# Altium PCB Fred_ New.PcbDoc (part 1 of 2)
Units mil, origin at the board's own origin, x right, y up, seen from the top; angles counter-clockwise.
Board outline 2300 x 2166 mil, 2 copper layers (Top Layer, Bottom Layer), stack 57 mil thick; 107 components, 63 nets, 302 pads, 87 vias.
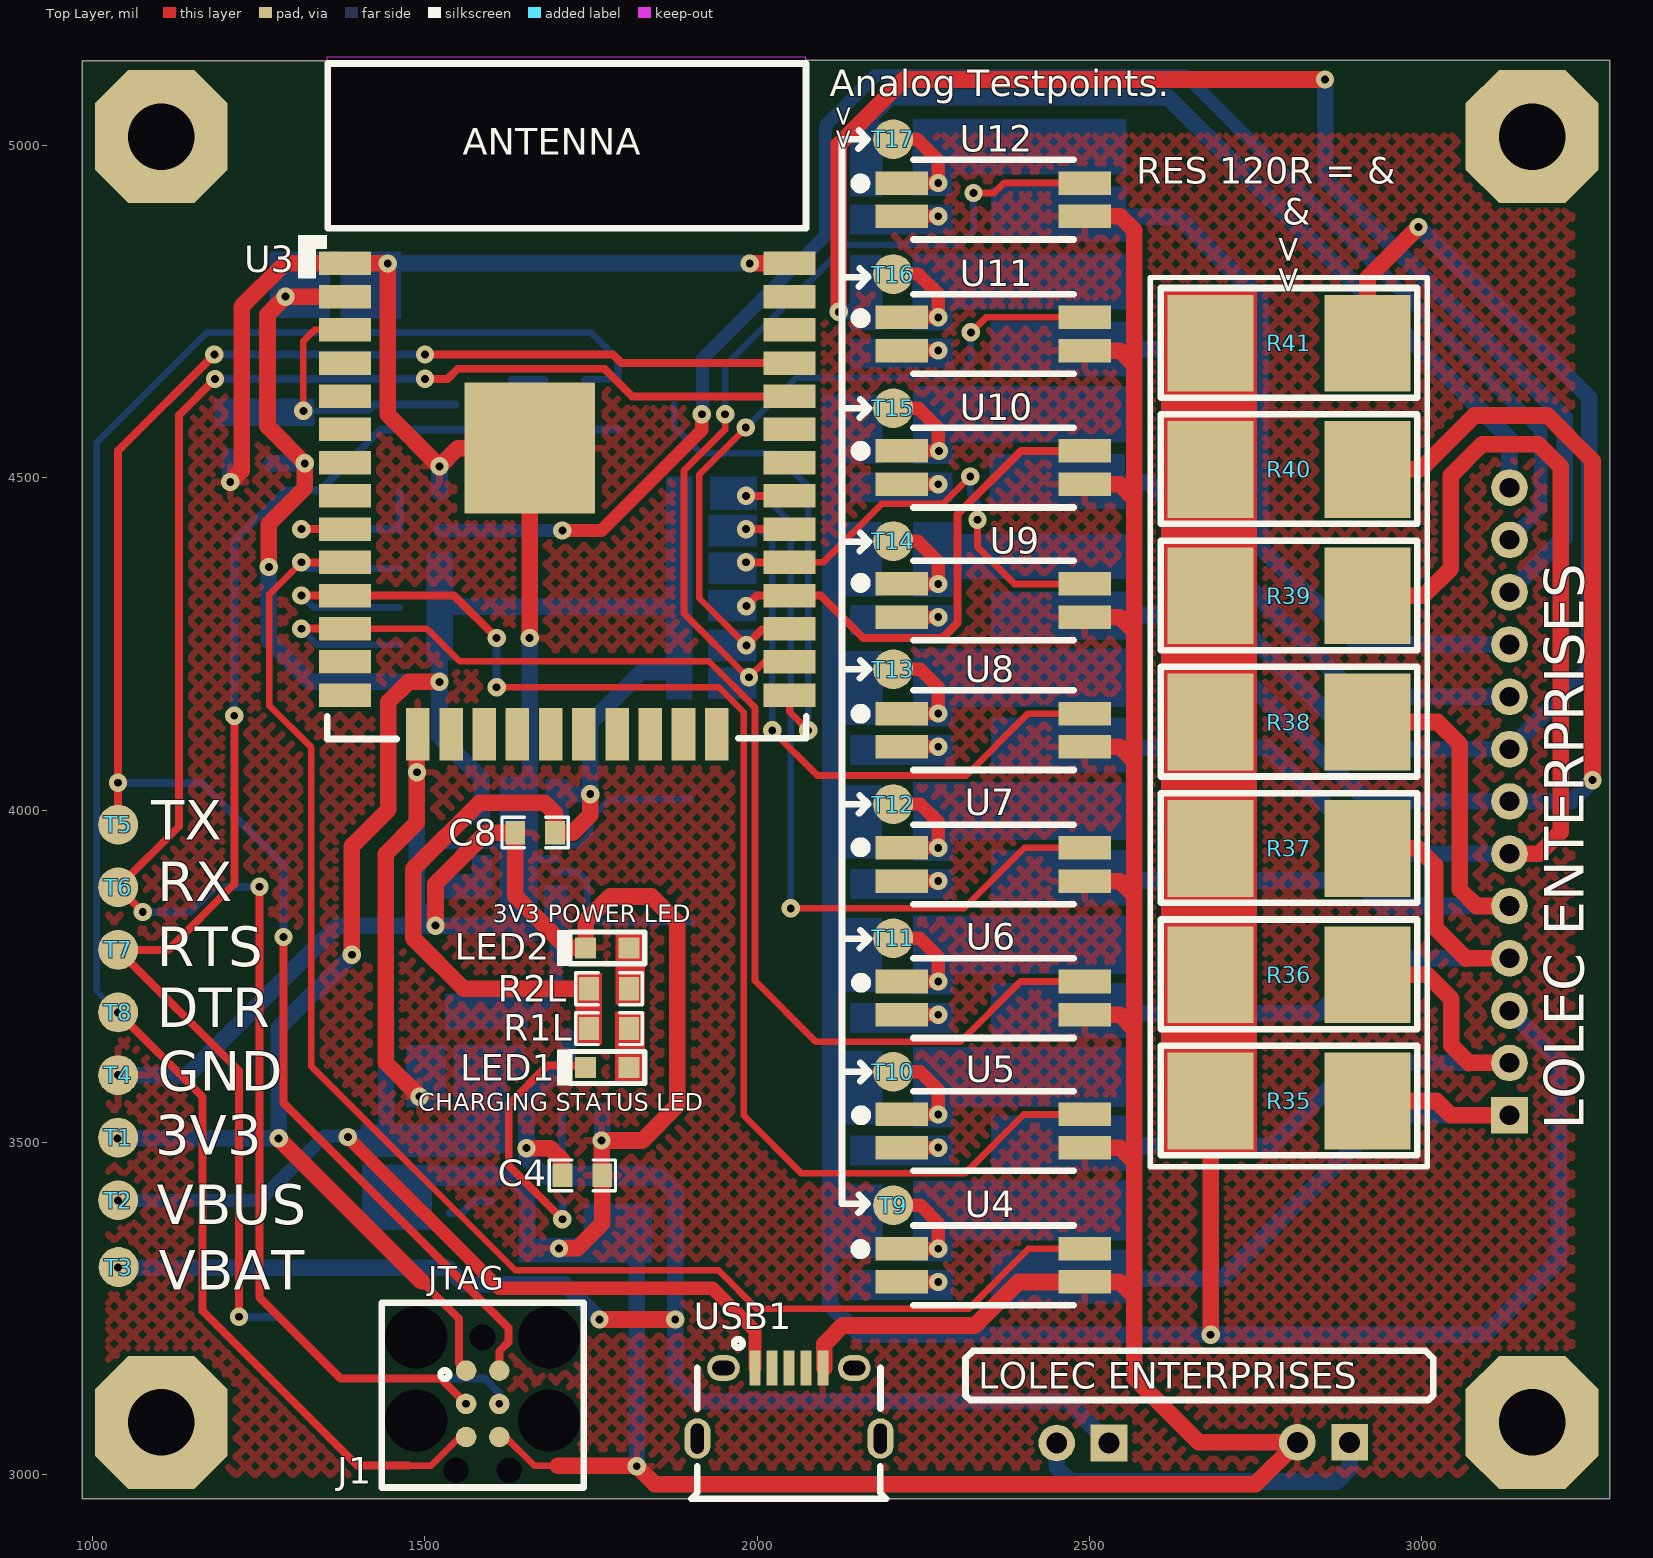
[diagram p0: Top Layer view]
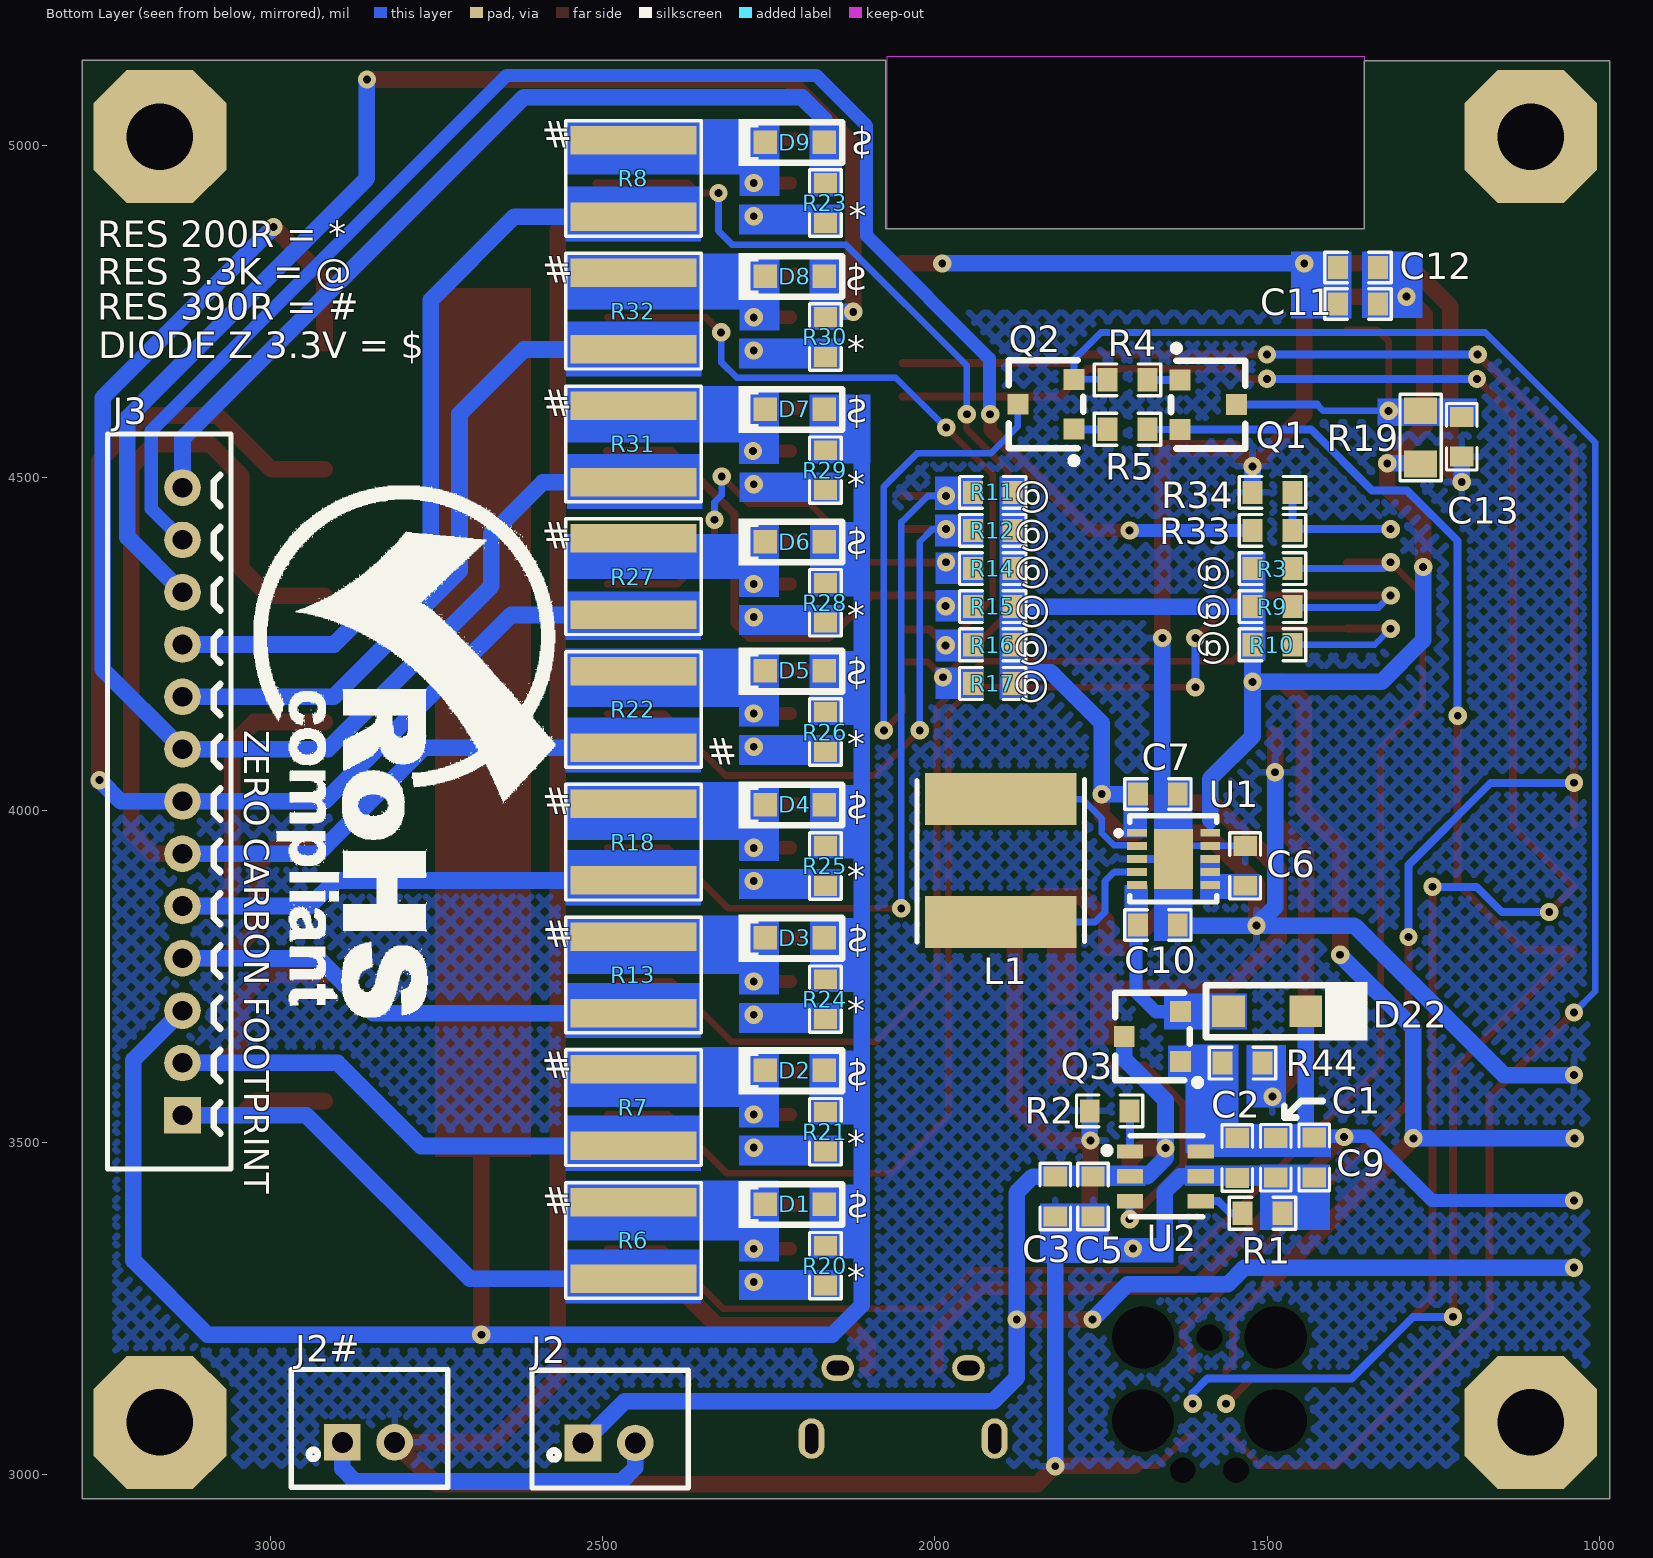
[diagram p1: Bottom Layer view, seen from below]
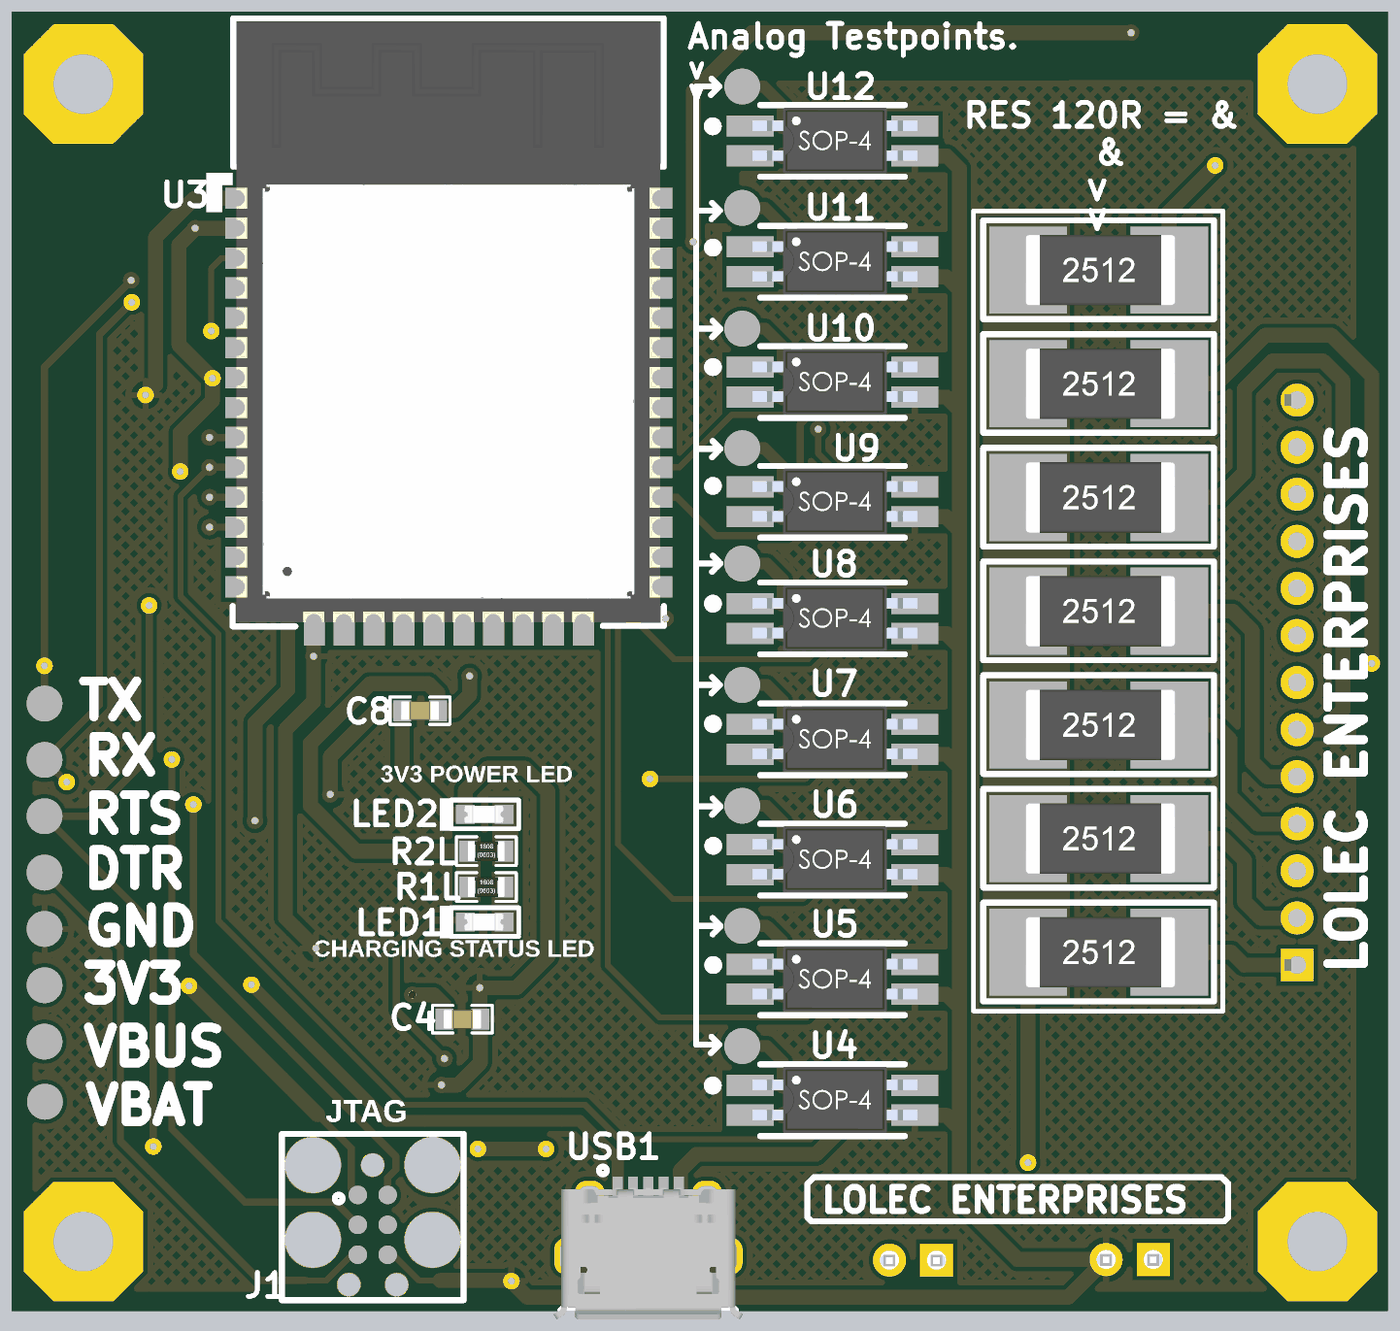
[diagram p2: 3D render of the assembled board from above, using the file's embedded part models]
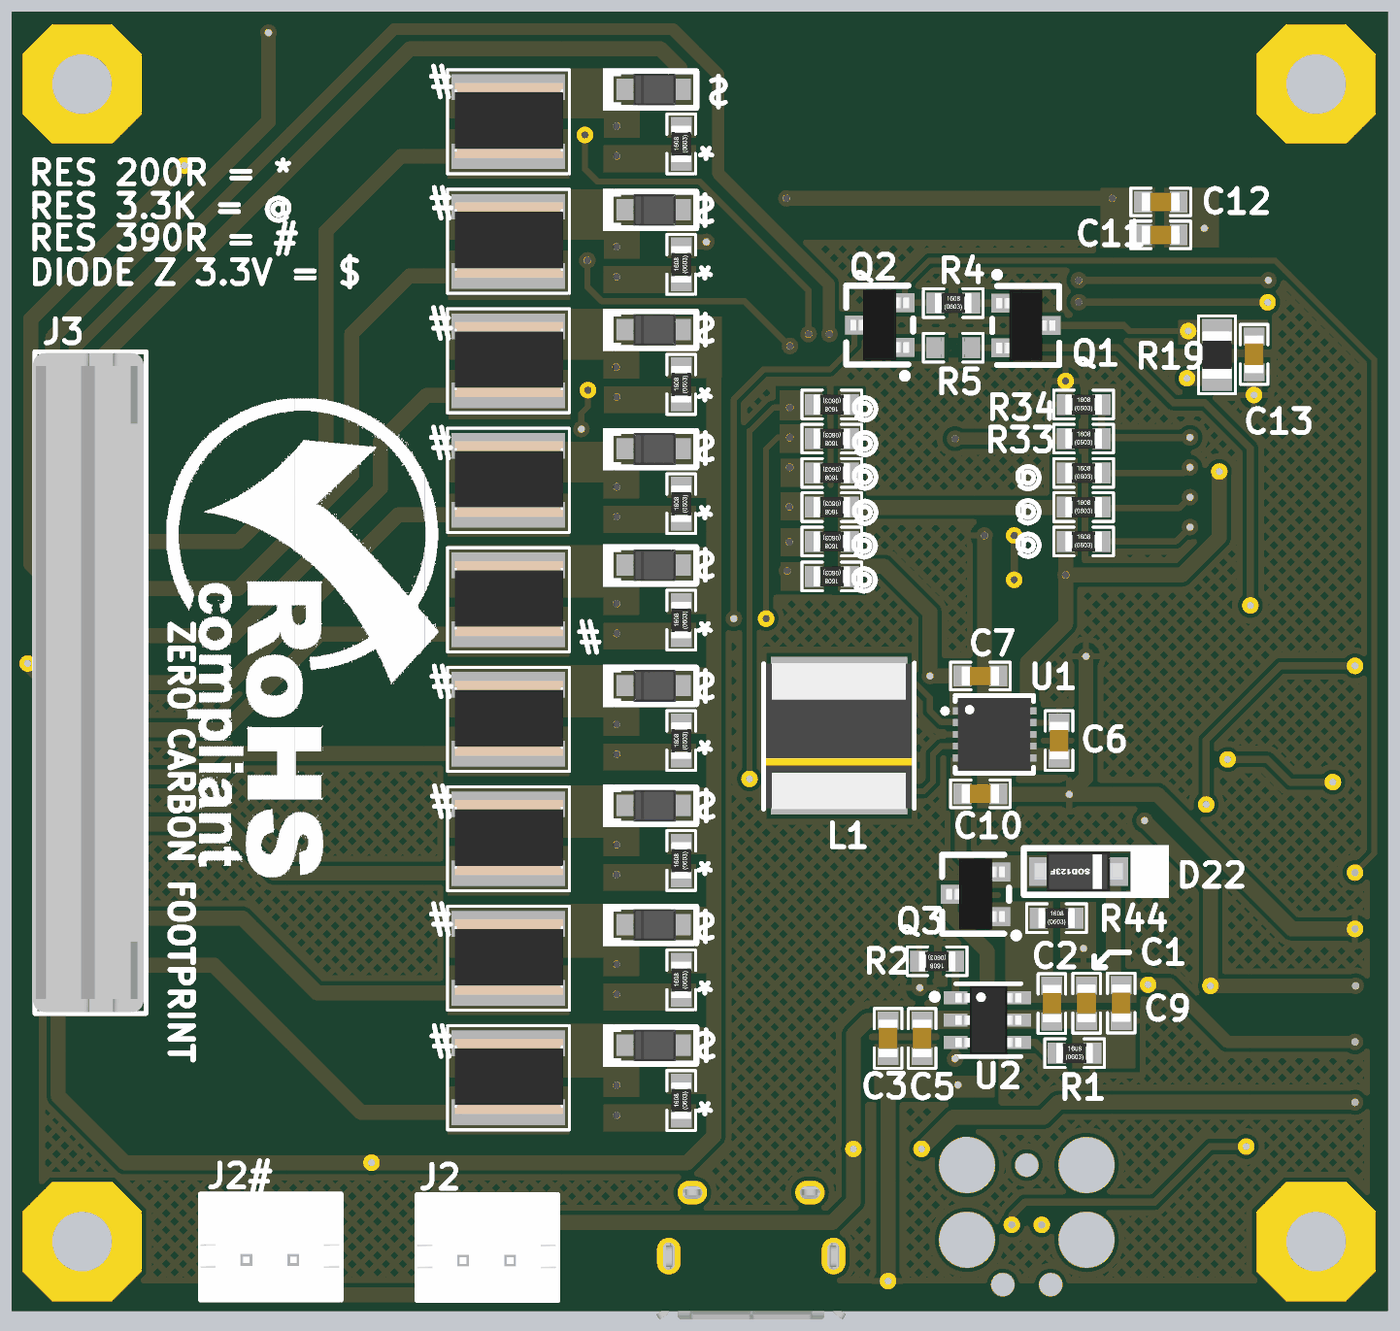
[diagram p3: 3D render of the assembled board from below, using the file's embedded part models]

## Layer stack, top to bottom
Top Solder: solder mask 3, Solder Resist, Dk 3.5
Top Layer: signal copper 10
Dielectric 1: dielectric 37, FR-4, Dk 4.8
Bottom Layer: signal copper 10
Bottom Solder: solder mask 3, Solder Resist, Dk 3.5

## Board outline
984,2963 984,5128 1353.71,5128 1353.71,4875 2074,4875 2074,5129 3284,5129 3284,2963
cut-out: 2073,4876 1353,4876 1353,5134 2073,5134

## Design rules (kind name [scope] priority, off if disabled: settings)
Clearance [All] p1: gap=7 ignorepadtopadclearanceinfootprint=FALSE
Height [All] p1: minheight=0 maxheight=5000 prefheight=500
HoleSize [All] p1: absolutevalues=TRUE maxlimit=500 minlimit=1 maxpercent=80.000 minpercent=20.000
HoleToHoleClearance [All] p1: gap=7 allowstackedmicrovias=TRUE
MinimumSolderMaskSliver [All] p1: minsoldermaskwidth=0
PolygonConnect [All] p1: connectstyle=Relief reliefconductorwidth=10 reliefentries=4 polygonreliefangle="90 Angle" airgapwidth=10
RoutingVias [All] p1: holewidth=11.81 width=27.56 viastyle="Through Hole" minholewidth=11.81 minwidth=27.56 maxholewidth=19.68 maxwidth=39.37
SilkToSilkClearance [All] p1: silktosilkclearance=1
SilkToSolderMaskClearance [IsPad] p1: minsilkscreentomaskgap=1 clearancetoexposedcopper=TRUE
SolderMaskExpansion SolderMaskExpansion_1 [Not Isvia] p1: expansion=4
SolderMaskExpansion [IsVia] p2: expansion=4 soldermaskfromhole=TRUE
UnRoutedNet [All] p1: checkbadconnections=TRUE
Width [All] p1: maxlimit=50 minlimit=10 preferedwidth=12 minimp=50.000000 maximp=50.000000 favimp=50.000000
23 further rules are at their usual default settings.

## Classes and differential pairs
component class Top_Sheet: T1 T2 T3 T4 T5 T6 T7 T8 USB1
component class U_Power_Section: C1 C2 C3 C4 C5 C6 C7 C8 C9 C10 C11 C12 D22 L1 LED1 LED2 Q3 R1 R1L R2 R2L R44 U1 U2
component class U_Opto_Section: D1 D2 D3 D4 D5 D6 D7 D8 D9 R6 R7 R8 R13 R18 R20 R21 R22 R23 R24 R25 R26 R27 R28 R29 R30 R31 R32 T9 T10 T11 T12 T13 T14 T15 T16 T17 U4 U5 U6 U7 U8 U9 U10 U11 U12
component class U_Controller_Section: C13 Q1 Q2 R3 R4 R5 R9 R10 R11 R12 R14 R15 R16 R17 R19 U3
component class U_Connector_Section: J1 J2 J2# J3 R33 R34 R35 R36 R37 R38 R39 R40 R41

## Components (designator, comment, footprint, x,y, rotation, side; value= is the part's Value field where it differs from the comment)
C1 "0.1uF" Cap0603 1487,3476.5 r90 bottom
C2 "4.7uF" Cap0603 1545,3476 r90 bottom
C3 "10uF" Cap0603 1819,3418 r90 bottom
C4 "0.1uF" Cap0603 1737,3450 r180 top
C5 "0.1uF" Cap0603 1762,3418 r90 bottom
C6 "0.1uF" Cap0603 1533,3916 r270 bottom
C7 "10uF" Cap0603 1664.52,4024 r0 bottom
C8 "0.1uF" Cap0603 1666,3966 r0 top
C9 "1uF" Cap0603 1429,3477 r90 bottom
C10 "0.1uF" Cap0603 1664.52,3827 r0 bottom
C11 "0.1uF" Cap0603 1363,4817 r180 bottom
C12 "0.1uF" Cap0603 1363,4761.88 r180 bottom
C13 "0.1uF" Cap0603 1206.83,4562 r90 bottom
D1 "MM3Z3V3B" MM3Z3V3B 2211,3406.5 r0 bottom
D2 "MM3Z3V3B" MM3Z3V3B 2211,3608 r0 bottom
D3 "MM3Z3V3B" MM3Z3V3B 2211,3807.5 r0 bottom
D4 "MM3Z3V3B" MM3Z3V3B 2211,4008 r0 bottom
D5 "MM3Z3V3B" MM3Z3V3B 2211,4209.5 r0 bottom
D6 "MM3Z3V3B" MM3Z3V3B 2211,4404 r0 bottom
D7 "MM3Z3V3B" MM3Z3V3B 2211,4603.5 r0 bottom
D8 "MM3Z3V3B" MM3Z3V3B 2211,4804 r0 bottom
D9 "MM3Z3V3B" MM3Z3V3B 2211,5005.5 r0 bottom
D22 "MBR120VLSFT3G" MBR120VLSFT3G 1442,3697 r0 bottom locked
J1 "TC2030-IDC" TC2030-IDC 1587,3106 r270 top locked
J2 "B2B-PH-K-S(LF)(SN)" B2B-PH-K-S(LF)(SN) 2490.63,3047 r180 bottom locked
J2# "B2B-PH-K-S(LF)(SN)" B2B-PH-K-S(LF)(SN) 2853,3048 r180 bottom locked
J3 "B13B-PH-K-S(LF)(SN)" B13B-PH-K-S(LF)(SN) 3133,4013 r90 bottom locked
L1 "NR6028T1R5N" NR6028T1R5N 1901,3924 r90 bottom
LED1 "APT1608QBC/D" "LED 0603" 1807,3612.46 r180 top
LED2 "APT1608QBC/D" "LED 0603" 1807,3792.46 r180 top
Q1 "MMBT2222A-7-F" SOT23-3 1588.68,4610.3 r270 bottom
Q2 "MMBT2222A-7-F" SOT23-3 1833,4611 r90 bottom
Q3 "DMP2045U-7" SOT23-3 1672.68,3659.01 r90 bottom
R1 "680R" Res0603 1507,3393 r180 bottom
R1L "330R" Res0603 1776.99,3671.02 r0 top
R2 "10K" Res0603 1737,3547 r0 bottom
R2L "330R" Res0603 1777,3731.02 r0 top
R3 "3.3K" Res0603 1492,4363.63 r180 bottom
R4 "10K" Res0603 1710,4647.7 r180 bottom
R5 "10K" Res0603 1710,4573.25 r0 bottom
R6 "390R" Res1218 2454,3352 r270 bottom
R7 "390R" Res1218 2454,3551.88 r270 bottom
R8 "390R" Res1218 2454,4951 r270 bottom
R9 "3.3K" Res0603 1492,4306.32 r180 bottom
R10 "3.3K" Res0603 1492,4249 r180 bottom
R11 "3.3K" Res0603 1913,4478.26 r0 bottom
R12 "3.3K" Res0603 1913,4420.95 r0 bottom
R13 "390R" Res1218 2454,3751.75 r270 bottom
R14 "3.3K" Res0603 1913,4363.63 r0 bottom
R15 "3.3K" Res0603 1913,4306.32 r0 bottom
R16 "3.3K" Res0603 1913,4249 r0 bottom
R17 "3.3K" Res0603 1913,4190.5 r0 bottom
R18 "390R" Res1218 2454,3951.62 r270 bottom
R19 "10K" Resistor0805 1268.83,4561 r270 bottom
R20 "200R" Res0603 2165.02,3314 r90 bottom
R21 "200R" Res0603 2165.02,3515.62 r90 bottom
R22 "390R" Res1218 2454,4151.5 r270 bottom
R23 "200R" Res0603 2165.02,4914 r90 bottom
R24 "200R" Res0603 2165.02,3715.25 r90 bottom
R25 "200R" Res0603 2165.02,3915.88 r90 bottom
R26 "200R" Res0603 2165.02,4117.5 r90 bottom
R27 "390R" Res1218 2454,4351.38 r270 bottom
R28 "200R" Res0603 2165.02,4312.12 r90 bottom
R29 "200R" Res0603 2165.02,4511.75 r90 bottom
R30 "200R" Res0603 2165.02,4712.38 r90 bottom
R31 "390R" Res1218 2454,4551.25 r270 bottom
R32 "390R" Res1218 2454,4751.12 r270 bottom
R33 "133K" Res0603 1492,4420.95 r180 bottom
R34 "49.3K" Res0603 1492,4478.26 r180 bottom
R35 "120R" Res2512 2801,3562 r0 top
R36 "120R" Res2512 2801,3752.17 r0 top
R37 "120R" Res2512 2801,3942.23 r0 top
R38 "120R" Res2512 2801,4132.5 r0 top
R39 "120R" Res2512 2801,4322.67 r0 top
R40 "120R" Res2512 2801,4512.83 r0 top
R41 "120R" Res2512 2801,4703 r0 top
R44 "100K" Res0603 1537,3619 r180 bottom
T1 "Socket" Socket 1038,3506.73 r0 top
T2 "Socket" Socket 1038,3412.48 r0 top
T3 "Socket" Socket 1038.73,3312 r0 top
T4 "Socket" Socket 1038,3600.99 r0 top
T5 "Socket" Socket 1038,3978 r0 top
T6 "Socket" Socket 1038,3883.75 r0 top
T7 "Socket" Socket 1038,3789.49 r0 top
T8 "Socket" Socket 1038,3695.24 r0 top
T9 "Socket" Socket 2205,3405 r0 top
T10 "Socket" Socket 2205,3606 r90 top
T11 "Socket" Socket 2205,3807 r0 top
T12 "Socket" Socket 2205,4009 r90 top
T13 "Socket" Socket 2205,4212 r90 top
T14 "Socket" Socket 2205,4405 r90 top
T15 "Socket" Socket 2205,4605 r90 top
T16 "Socket" Socket 2205,4807 r90 top
T17 "Socket" Socket 2205,5010 r270 top
U1 "TPS63031DSKR" TPS63031DSKR 1640.72,3926.37 r180 bottom locked
U2 "BQ21040DBVR" BQ21040DBVR 1653,3448.5 r180 bottom locked
U3 "ESP32-WROOM-32" ESP32-WROOM-32 1379.71,4823 r0 top locked
U4 "PS2801C-1-F3-A" PS2801C-1-F3-A 2218.02,3339.5 r0 top locked
U5 "PS2801C-1-F3-A" PS2801C-1-F3-A 2218.02,3541.68 r0 top locked
U6 "PS2801C-1-F3-A" PS2801C-1-F3-A 2218.02,3741.87 r0 top locked
U7 "PS2801C-1-F3-A" PS2801C-1-F3-A 2218.02,3943.06 r0 top locked
U8 "PS2801C-1-F3-A" PS2801C-1-F3-A 2218.02,4145.25 r0 top locked
U9 "PS2801C-1-F3-A" PS2801C-1-F3-A 2218.02,4340.44 r0 top locked
U10 "PS2801C-1-F3-A" PS2801C-1-F3-A 2218.02,4540.62 r0 top locked
U11 "PS2801C-1-F3-A" PS2801C-1-F3-A 2218.02,4741.81 r0 top locked
U12 "PS2801C-1-F3-A" PS2801C-1-F3-A 2218.02,4944 r0 top locked
USB1 "C10418" C10418 2048,3160 r0 top locked

## Footprints (in the part's own frame and the unit in brackets; to place one, negate y for a bottom-side part, rotate by r counter-clockwise, add the part's x,y. Pads: shape width x height; smd on the part's side, far side on the other; paste and mask are expansions set on the pad)
B2B-PH-K-S(LF)(SN) [mm]
  rect 1.4x1.4 hole 0.8: 1(-1,0)
  round 1.4 hole 0.8: 2(1,0)
  silkscreen extent -2.95,-1.72 3.03,2.78, body extent -2.95,-1.72 2.95,2.78, height 6
B13B-PH-K-S(LF)(SN) [mm]
  rect 1.4x1.4 hole 0.75: 1(-12,0)
  round 1.4 hole 0.75: 2(-10,0) 3(-8,0) 4(-6,0) 5(-4,0) 6(-2,0) 7(0,0) 8(2,0) 9(4,0) 10(6,0) 11(8,0) 12(10,0) 13(12,0)
  silkscreen extent -14.06,-1.85 14.05,2.87, body extent -14,-1.75 14,2.95, height 6
BQ21040DBVR [mm]
  rect 1x0.55 smd: 1(-1.35,0.95) 2(-1.35,0) 3(-1.35,-0.95) 4(1.35,-0.95) 5(1.35,0) 6(1.35,0.95)
  silkscreen extent -2.36,-1.55 1.42,1.55, body extent -1.35,-1.45 1.45,1.45, height 1.37
C10418 [mm] "USB - Micro B Female USB 2 5 SMD USB Connectors RoHS"
  rect 0.42x1.35 smd: 1(-1.3,0) 2(-0.65,0) 3(0,0) 4(0.65,0) 5(1.3,0)
  oval 1.25x1 hole 0.55 slot 0.85 at 0 deg: MH1(-2.5,0) MH2(2.5,0)
  oval 1x1.55 hole 0.5 slot 1.15 at 90 deg: MH3(-3.5,-2.7) MH4(3.5,-2.7)
  silkscreen extent -3.73,-5 3.72,1.1, body extent -7.67,-5.38 4.02,0.2, height 2.72
Cap0603 [mil]
  rect 30x35 smd: 1(30,0) 2(-30,0)
  silkscreen extent -50,-23 50,23, body extent -31,-16 32,16, height 34
ESP32-WROOM-32 [mm] "SMD MODULE, ESP32-D0WDQ6, 32MBIT"
  rect 2x0.9 smd: 1(0,0) 2(0,-1.27) 3(0,-2.54) 4(0,-3.81) 5(0,-5.08) 6(0,-6.35) 7(0,-7.62) 8(0,-8.89) 9(0,-10.16) 10(0,-11.43) 11(0,-12.7) 12(0,-13.97) 13(0,-15.24) 14(0,-16.51)
  rect 0.9x2 smd: 15(2.785,-18.01) 16(4.055,-18.01) 17(5.325,-18.01) 18(6.595,-18.01) 19(7.865,-18.01) 20(9.135,-18.01) 21(10.405,-18.01) 22(11.675,-18.01) 23(12.945,-18.01) 24(14.215,-18.01)
  rect 2x0.9 smd paste+0: 25(17,-16.51) 26(17,-15.24) 27(17,-13.97) 28(17,-12.7) 29(17,-11.43) 30(17,-10.16) 31(17,-8.89) 32(17,-7.62) 33(17,-6.35) 34(17,-5.08) 35(17,-3.81) 36(17,-2.54) 37(17,-1.27) 38(17,0)
  rect 5x5 smd: 39(7.061,-7.061)
  silkscreen extent -1.8,-18.19 17.64,7.65, body extent -0.52,-18.01 17.48,7.49, height 3.25
"LED 0603" [mm] "LED BLUE CLEAR CHIP SMD"
  rect 0.8x0.8 smd: 1(0,0) 2(1.65,0)
  silkscreen extent -0.61,-0.69 2.74,0.69, body extent 0.04,-0.37 1.69,0.36, height 0.65
MBR120VLSFT3G [mm] "DIODE SCHOTTKY 20V 1A SOD123FL"
  rect 1.25x1.22 smd: 1(0,0) 2(2.95,0)
  silkscreen extent -2.36,-1.12 3.81,1.12, body extent -0.4,-0.85 3.35,0.85, height 1.2
MM3Z3V3B [mm] "DIODE ZENER 3.3V 200MW SOD323F"
  rect 0.9x0.9 smd: 1(-1.125,0) 2(1.125,0)
  silkscreen extent -1.81,-0.89 2.15,0.91, body extent -1.38,-0.66 1.32,0.69, height 0.75
NR6028T1R5N [mm] "FIXED IND 1.5UH 4.2A 20.8 MOHM"
  rect 2x5.8 smd: 1(-2.35,0) 2(2.35,0)
  silkscreen extent -3.11,-3.2 3.09,3.2, body extent -3.11,-3.1 3.09,3.1, height 2.79
PS2801C-1-F3-A [mm]
  rect 2x0.9 smd: 1(0,0) 2(0,-1.27) 3(7,-1.27) 4(7,0)
  silkscreen extent -1.76,-2.16 6.58,0.89, body extent 0.11,-2.02 7.11,0.78, height 2.1
Res0603 [mil]
  rect 30x35 smd: 1(30,0) 2(-30,0)
  silkscreen extent -50,-24 50,24, body extent -31,-17 31,17, height 18
Res1218 [mm]
  rect 1.09x4.82 smd: 1(-1.465,0) 2(1.465,0)
  silkscreen extent -2.21,-2.59 2.21,2.59, body extent -1.65,-2.29 1.55,2.32, height 0.28
Res2512 [mm]
  rect 3.3x3.7 smd: 1(-3,0) 2(3,0)
  silkscreen extent -4.9,-2.08 4.9,2.11, body extent -3.1,-1.5 3.25,1.5, height 1.6
Resistor0805 [mil] "SMD 0805"
  rect 40x50 smd: 1(-40,0) 2(40,0)
  silkscreen extent -65,-31 65,31, body extent -39,-25 39,24, height 24
Socket [mil]
  round 60 smd: 1(0,0)
SOT23-3 [mm] "SOT23, 3-Leads, Body 2.9x1.3mm, Pitch 0.95mm, Lead Span 2.3mm - Reverse Pinning, IPC High Density"
  rect 0.8x0.8 smd: 1(-0.95,-1.075) 2(0.95,-1.075) 3(0,1.075)
  silkscreen extent -2.28,-1.42 1.68,1.42, body extent -1.5,-1.25 1.5,1.25, height 1.05
TC2030-IDC [mm] "CABLE ADAPTER 6 POS"
  round 0.787 smd: 1(-1.27,-0.635) 1(-1.27,-0.635) 2(-1.27,0.635) 3(0,-0.635) 4(0,0.635) 5(1.27,-0.635) 6(1.27,0.635)
  round 0 hole 2.375: MP1(-2.54,-2.54) MP2(0.635,-2.54) MP3(0.635,2.54) MP4(-2.54,2.54)
  round 0 hole 0.991: MP5(-2.54,0) MP6(2.54,-1.016) MP7(2.54,1.016)
  silkscreen extent -3.86,-3.86 3.2,3.86
TPS63031DSKR [mm] "Conv DC-DC 1.8V to 5.5V Non-Inv/Inv/Step Up/Step Down Single-Out 3.3V 0.8A 10-Pin WSON"
  rect 0.75x0.3 smd: 1(-1.4,1) 2(-1.4,0.5) 3(-1.4,0) 4(-1.4,-0.5) 5(-1.4,-1) 6(1.4,-1) 7(1.4,-0.5) 8(1.4,0) 9(1.4,0.5) 10(1.4,1)
  rect 1.5x2.3 smd: 11(0,0)
  silkscreen extent -2.21,-1.65 1.65,1.65, body extent -1.57,-1.55 1.55,1.55, height 0.7

## Part data
C1 C4 C5 C6 C8 C10 C11 C12 C13: library part CC0603ZRY5V9BB104, "CAP CER 0.1UF 50V Y5V 0603", Capacitance=100nF, Case/Package=0603, Case Code (Metric)=1608, Dielectric=Y5V, MANUFACTURER=Yageo, Max Operating Temperature=85°C, Min Operating Temperature=-30°C, Package Quantity=1, Supplier Part Number 1=311-1343-1-ND, Tolerance=80%, Voltage=50V, Case Code (Imperial)=0603, ComponentLink1Description=http://www.yageo.com/documents/recent/UPY-GPHC_Y5V_6.3V-to-50V_8.pdf?src-supplier=Digi-Key, ComponentLink1URL=http://www.yageo.com/documents/recent/UPY-GPHC_Y5V_6.3V-to-50V_8.pdf?src-supplier=Digi-Key, ComponentLink2Description=http://www.yageo.com/documents/recent/UPY-GPHC_Y5V_6.3V-to-50V_5.pdf?src-supplier=Avnet+Europe, ComponentLink2URL=http://www.yageo.com/documents/recent/UPY-GPHC_Y5V_6.3V-to-50V_5.pdf?src-supplier=Avnet+Europe, ComponentLink3Description=https://www.verical.com/server-webapp/html/getDatasheet?partID=403611&src-supplier=Verical, ComponentLink3URL=https://www.verical.com/server-webapp/html/getDatasheet?partID=403611&src-supplier=Verical, ComponentLink4Description=http://www.mouser.com/ds/2/447/Yageo_UPY-GP_NP0_16V-to-50V_9-358835.pdf?src-supplier=Mouser, ComponentLink4URL=http://www.mouser.com/ds/2/447/Yageo_UPY-GP_NP0_16V-to-50V_9-358835.pdf?src-supplier=Mouser, ComponentLink5Description=http://www.farnell.com/datasheets/1132289.pdf?src-supplier=Element14, ComponentLink5URL=http://www.farnell.com/datasheets/1132289.pdf?src-supplier=Element14, Composition=Ceramic, Depth=0.8mm, Halogen Free="Halogen Free", Height=0.8mm, Lead Free="Lead Free", Length=1.6mm, Manufacturer Part Number=CC0603ZRY5V9BB104, Mount="Surface Mount", Number of Pins=2, Packaging="Tape and Reel", Pricing 1="1=0.1, 10=0.075, 100=0.0334, 500=0.02386, 1000=0.01874 (USD)", Radiation Hardening=No, REACH SVHC="No SVHC", Stock 1=15000880, Supplier 1=Digi-Key, Termination=SMD/SMT, Thickness=0.035inch, Voltage Rating=50V, Voltage Rating (DC)=50V, Width=0.031inch
C2: library part GRM188R61E475KE11D, "CAP CER 4.7UF 25V X5R 0603", Case/Package=0603, Case Code (Metric)=1608, Dielectric=X5R, MANUFACTURER=Murata, Max Operating Temperature=85°C, Min Operating Temperature=-55°C, Package Quantity=4000, Supplier Part Number 1=490-7203-1-ND, Tolerance=10%, Voltage=25V, Capacitance=4.7uF, Case Code (Imperial)=0603, ComponentLink1Description=http://www.farnell.com/datasheets/2048165.pdf?src-supplier=Element14, ComponentLink1URL=http://www.farnell.com/datasheets/2048165.pdf?src-supplier=Element14, ComponentLink2Description=https://www.murata.com/~/media/webrenewal/support/library/catalog/products/capacitor/mlcc/c02e.ashx?la=en-us&src-supplier=Digi-Key, ComponentLink2URL=https://www.murata.com/~/media/webrenewal/support/library/catalog/products/capacitor/mlcc/c02e.ashx?la=en-us&src-supplier=Digi-Key, Depth=0.8mm, Height=0.8mm, Lead Free="Lead Free", Length=1.6mm, Manufacturer Part Number=GRM188R61E475KE11D, Material=Ceramic, Mount="Surface Mount", Packaging="Cut Tape", Pricing 1="1=0.37, 10=0.258, 100=0.1549, 500=0.1162, 1000=0.09812 (USD)", REACH SVHC="No SVHC", Stock 1=71618, Supplier 1=Digi-Key, Thickness=0.031inch, Voltage Rating=25V, Voltage Rating (DC)=25V, Width=0.031inch
C3 C7: library part C1608X5R1E106M080AC, "CAP CER 10UF 25V X5R 0603", Case/Package=0603, Case Code (Metric)=1608, Dielectric=X5R, Dielectric Material=Ceramic, MANUFACTURER=TDK, Max Operating Temperature=85°C, Min Operating Temperature=-55°C, Package Quantity=1, Supplier Part Number 1=445-9015-1-ND, Tolerance=20%, Voltage Rating=25V, Capacitance=10uF, Case Code (Imperial)=0603, Composition=Ceramic, Depth=0.8mm, Height=0.8mm, Lead Free="Lead Free", Length=1.6mm, Manufacturer Part Number=C1608X5R1E106M080AC, Mount="Surface Mount", Packaging="Tape and Reel", Pricing 1="1=0.96, 10=0.704, 100=0.483, 500=0.38238, 1000=0.322 (USD)", REACH SVHC="No SVHC", Stock 1=61681, Supplier 1=Digi-Key, Termination=SMD/SMT, Thickness=0.039inch, Voltage Rating (DC)=25V, Weight=7.1E-05oz, Width=0.8mm
C9: library part UMK107AB7105KA-T, "CAP CER 1UF 50V X7R 0603", Case/Package=0603, Case Code (Metric)=1608, Dielectric=X7R, MANUFACTURER="Taiyo Yuden", Max Operating Temperature=125°C, Min Operating Temperature=-55°C, Package Quantity=1, Supplier Part Number 1=587-3247-1-ND, Tolerance=10%, Voltage Rating=50V, Capacitance=1uF, Case Code (Imperial)=0603, ComponentLink1Description=http://www.farnell.com/datasheets/2048165.pdf?src-supplier=Element14, ComponentLink1URL=http://www.farnell.com/datasheets/2048165.pdf?src-supplier=Element14, ComponentLink2Description=https://www.murata.com/~/media/webrenewal/support/library/catalog/products/capacitor/mlcc/c02e.ashx?la=en-us&src-supplier=Digi-Key, ComponentLink2URL=https://www.murata.com/~/media/webrenewal/support/library/catalog/products/capacitor/mlcc/c02e.ashx?la=en-us&src-supplier=Digi-Key, ComponentLink3Description=https://www.yuden.co.jp/productdata/catalog/mlcc_all_e.pdf?src-supplier=Digi-Key, ComponentLink3URL=https://www.yuden.co.jp/productdata/catalog/mlcc_all_e.pdf?src-supplier=Digi-Key, ComponentLink4Description=https://www.yuden.co.jp/productdata/catalog/mlcc_all_e.pdf?src-supplier=Onlinecomponents.com, ComponentLink4URL=https://www.yuden.co.jp/productdata/catalog/mlcc_all_e.pdf?src-supplier=Onlinecomponents.com, Depth=0.8mm, Halogen Free="Halogen Free", Height=0.8mm, Length=1.6mm, Manufacturer Part Number=UMK107AB7105KA-T, Mount="Surface Mount", Packaging="Tape and Reel", Pricing 1="1=0.28, 10=0.19, 100=0.1079, 500=0.0762, 1000=0.0667 (USD)", Radiation Hardening=No, Stock 1=453098, Supplier 1=Digi-Key, Termination=SMD/SMT, Thickness=0.037inch, Voltage Rating (DC)=50V, Width=0.031inch
D1 D2 D3 D4 D5 D6 D7 D8 D9: "DIODE ZENER 3.3V 200MW SOD323F", Forward Voltage=1V, MANUFACTURER="ON Semiconductor / Fairchild", Max Operating Temperature=150°C, Max Power Dissipation=200mW, Max Reverse Leakage Current=4.5uA, Min Operating Temperature=-65°C, Package Quantity=1, Supplier Part Number 1=MM3Z3V3BCT-ND, Test Current=5mA, Tolerance=2%, Working Voltage=3.3V, ComponentLink1Description=http://www.onsemi.com/pub/Collateral/MM3Z9V1B-D.pdf?src-supplier=Digi-Key, ComponentLink1URL=http://www.onsemi.com/pub/Collateral/MM3Z9V1B-D.pdf?src-supplier=Digi-Key, ComponentLink2Description=http://www.mouser.com/ds/2/149/MM3Z3V3B-187166.pdf?src-supplier=Mouser, ComponentLink2URL=http://www.mouser.com/ds/2/149/MM3Z3V3B-187166.pdf?src-supplier=Mouser, ComponentLink3Description=https://www.fairchildsemi.com/datasheets/MM/MM3Z9V1B.pdf?src-supplier=Avnet, ComponentLink3URL=https://www.fairchildsemi.com/datasheets/MM/MM3Z9V1B.pdf?src-supplier=Avnet, ComponentLink4Description=http://www.farnell.com/datasheets/1706525.pdf?src-supplier=Element14, ComponentLink4URL=http://www.farnell.com/datasheets/1706525.pdf?src-supplier=Element14, Element Configuration=Single, Height=1mm, Impedance=89R, Lead Free="Lead Free", Length=1.3mm, Manufacturer Part Number=MM3Z3V3B, Mount="Surface Mount", Number of Pins=2, Packaging="Tape and Reel", Peak Reverse Current=4.5uA, Power Dissipation=200mW, Pricing 1="1=0.22, 10=0.18, 100=0.0956, 500=0.06288, 1000=0.04276 (USD)", Radiation Hardening=No, REACH SVHC="No SVHC", Stock 1=473644, Supplier 1=Digi-Key, Voltage Tolerance=2%, Weight=0.0276g, Width=1.7mm, Zener Voltage=3.3V
D22: "DIODE SCHOTTKY 20V 1A SOD123FL", Average Rectified Current=1A, Forward Voltage=340mV, MANUFACTURER="ON Semiconductor", Max Forward Surge Current (Ifsm)=45A, Max Operating Temperature=125°C, Max Repetitive Reverse Voltage (Vrrm)=20V, Max Reverse Leakage Current=600uA, Min Operating Temperature=-65°C, Package Quantity=10000, Supplier Part Number 1=MBR120VLSFT3GOSCT-ND, ComponentLink1Description=http://www.mouser.com/ds/2/308/MBR120VLSFT1-D-107081.pdf?src-supplier=Mouser, ComponentLink1URL=http://www.mouser.com/ds/2/308/MBR120VLSFT1-D-107081.pdf?src-supplier=Mouser, ComponentLink2Description=http://www.onsemi.com/pub/Collateral/MBR120VLSFT1-D.PDF?src-supplier=Digi-Key, ComponentLink2URL=http://www.onsemi.com/pub/Collateral/MBR120VLSFT1-D.PDF?src-supplier=Digi-Key, ComponentLink3Description=http://www.onsemi.cn/pub_link/Collateral/MBR120VLSFT1-D.PDF?src-supplier=Avnet, ComponentLink3URL=http://www.onsemi.cn/pub_link/Collateral/MBR120VLSFT1-D.PDF?src-supplier=Avnet, Current Rating=1A, Element Configuration=Single, Forward Current=1A, Halogen Free="Halogen Free", Lead Free="Lead Free", Manufacturer Part Number=MBR120VLSFT3G, Max Reverse Voltage (DC)=20V, Max Surge Current=45A, Number of Pins=2, Output Current=1A, Packaging="Tape and Reel", Peak Non-Repetitive Surge Current=45A, Peak Reverse Current=600uA, Polarity=Standard, Pricing 1="1=0.42, 10=0.338, 100=0.2298, 500=0.17234, 1000=0.12926 (USD)", Radiation Hardening=No, REACH SVHC="No SVHC", Stock 1=130499, Supplier 1=Digi-Key, Voltage Rating (DC)=20V
J1: "CABLE ADAPTER 6 POS", MANUFACTURER=Tag-Connect, Package Quantity=1, Supplier Part Number 1=TC2030-IDC-ND, ComponentLink1Description=http://www.tag-connect.com/Materials/TC2030-MCP%20Datasheet.pdf?src-supplier=Digi-Key, ComponentLink1URL=http://www.tag-connect.com/Materials/TC2030-MCP%20Datasheet.pdf?src-supplier=Digi-Key, Manufacturer Part Number=TC2030-IDC, Pricing 1="1=43.71 (USD)", Stock 1=284, Supplier 1=Digi-Key
J2 J2#: "CONN HEADER VERT 2POS 2MM", MANUFACTURER=JST, Supplier Part Number 1=455-1704-ND, Height=0.35inch, Length=0.2inch, Manufacturer Part Number=B2B-PH-K-S(LF)(SN), Pricing 1="1=0.17, 10=0.162, 100=0.1002, 500=0.08288, 1000=0.07252, 5000=0.06216, 10000=0.06044 (USD)", Stock 1=36331, Supplier 1=Digi-Key, Weight=0.0625lb, Width=0.24inch
J3: "CONN HEADER VERT 13POS 2MM", Color=Natural, Current Rating=2A, MANUFACTURER=JST, Supplier Part Number 1=455-1715-ND, Connector Type="Male Pin", Contact Material=Tin, Contact Mating Length=0.13inch, Contact Plating=Tin, Fastening Type=Detent, Gender=Male, Height=9.4mm, Housing Color=Natural, Lead Free="Lead Free", Length=27.9mm, Manufacturer Part Number=B13B-PH-K-S(LF)(SN), Mount="Through Hole", Number of Contacts=13, Number of Positions=13, Number of Rows=1, Packaging=Bulk, Pitch=0.079inch, Pricing 1="1=0.59, 10=0.549, 100=0.4206, 500=0.36574, 1000=0.30173, 5000=0.26516, 10000=0.24687 (USD)", Stock 1=5302, Supplier 1=Digi-Key, Termination=Press-Fit, Width=4.5mm
L1: "FIXED IND 1.5UH 4.2A 20.8 MOHM", Case/Package=2424, Current Rating=920mA, DC Resistance (DCR)=390mR, Inductance=47uh, Inductance Tolerance=20%, MANUFACTURER="Taiyo Yuden", Manufacturer Part Number=NR6028T470M, Max Operating Temperature=120°C, Min Operating Temperature=-25°C, Package Quantity=2000, Saturation Current=950mA, Self Resonant Frequency=8MHz, Supplier Part Number 1=587-2104-1-ND, Test Frequency=100kHz, ComponentLink1Description=https://www.yuden.co.jp/productdata/catalog/wound04_e.pdf?src-supplier=Avnet, ComponentLink1URL=https://www.yuden.co.jp/productdata/catalog/wound04_e.pdf?src-supplier=Avnet, ComponentLink2Description=https://www.yuden.co.jp/productdata/catalog/wound04_e.pdf?src-supplier=Digi-Key, ComponentLink2URL=https://www.yuden.co.jp/productdata/catalog/wound04_e.pdf?src-supplier=Digi-Key, ComponentLink3Description=https://www.yuden.co.jp/productdata/catalog/wound04_e.pdf?src-supplier=Onlinecomponents.com, ComponentLink3URL=https://www.yuden.co.jp/productdata/catalog/wound04_e.pdf?src-supplier=Onlinecomponents.com, ComponentLink4Description=https://www.yuden.co.jp/productdata/catalog/wound04_e.pdf?src-supplier=Mouser, ComponentLink4URL=https://www.yuden.co.jp/productdata/catalog/wound04_e.pdf?src-supplier=Mouser, Composition=Wirewound, Core Material=Ferrite, Halogen Free="Halogen Free", Height=2.8mm, Height - Seated (Max)=0.11inch, Length=0.236inch, Max DC Current=920mA, Mount="Surface Mount", Number of Pins=2, Packaging="Tape and Reel", Pricing 1="1=0.36, 10=0.317, 100=0.2182, 500=0.18648, 1000=0.14283 (USD)", REACH SVHC=Unknown, RMS Current (Irms)=920mA, Shielding=Shielded, Stock 1=42241, Supplier 1=Digi-Key, Termination=SMD/SMT, Tolerance=20%, Width=0.236inch
LED1 LED2: "LED BLUE CLEAR CHIP SMD", Case/Package=0603, Case Code (Metric)=1608, Color=Blue, Forward Current=20mA, Forward Voltage=3.3V, Lens Color=Clear,Colorless, MANUFACTURER=Kingbright, Max Operating Temperature=85°C, Min Operating Temperature=-40°C, Package Quantity=2000, Supplier Part Number 1=754-1434-1-ND, Case Code (Imperial)=0603, ComponentLink1Description=http://www.kingbrightusa.com/images/catalog/SPEC/APT1608QBC-D.pdf?src-supplier=Digi-Key, ComponentLink1URL=http://www.kingbrightusa.com/images/catalog/SPEC/APT1608QBC-D.pdf?src-supplier=Digi-Key, ComponentLink2Description=http://www.mouser.com/ds/2/216/APT1608QBC-D-65281.pdf?src-supplier=Mouser, ComponentLink2URL=http://www.mouser.com/ds/2/216/APT1608QBC-D-65281.pdf?src-supplier=Mouser, Dominant Wavelength=465nm, Height=0.75mm, Illumination Color=Blue, Lead Free="Lead Free", Length=1.6mm, Lens Style=Clear,Flat, Lens Transparency=Clear, Luminous Intensity=100mcd, Manufacturer Part Number=APT1608QBC/D, Mount="Surface Mount", Number of LEDs=1, Number of Pins=2, Packaging="Tape and Reel", Pricing 1="1=0.49, 10=0.35, 25=0.286, 100=0.2288, 250=0.19304, 500=0.16446, 1000=0.1287 (USD)", Stock 1=106851, Supplier 1=Digi-Key, Test Current=20mA, Viewing Angle=120°, Width=0.8mm
Q1 Q2: "TRANS NPN 40V 0.6A SMD SOT23-3", Case/Package=SOT-23, Collector Base Voltage (VCBO)=75V, Collector Emitter Breakdown Voltage=40V, Collector Emitter Saturation Voltage=1V, Continuous Collector Current=600mA, Current=1A, Emitter Base Voltage (VEBO)=6V, Frequency=300MHz, MANUFACTURER=Diodes, Max Operating Temperature=150°C, Max Power Dissipation=300mW, Min Operating Temperature=-55°C, Package Quantity=3000, Power Dissipation=350mW, Supplier Part Number 1=MMBT2222A-FDIDKR-ND, Collector Emitter Voltage (VCEO)=40V, ComponentLink1Description=http://www.diodes.com/datasheets/ds30041.pdf?src-supplier=Future+Electronics, ComponentLink1URL=http://www.diodes.com/datasheets/ds30041.pdf?src-supplier=Future+Electronics, ComponentLink2Description=http://www.diodes.com/datasheets/ds30041.pdf?src-supplier=Avnet, ComponentLink2URL=http://www.diodes.com/datasheets/ds30041.pdf?src-supplier=Avnet, ComponentLink3Description=https://www.verical.com/server-webapp/html/getDatasheet?partID=82692&src-supplier=Verical, ComponentLink3URL=https://www.verical.com/server-webapp/html/getDatasheet?partID=82692&src-supplier=Verical, ComponentLink4Description=https://www.diodes.com/assets/Datasheets/ds30041.pdf?src-supplier=Digi-Key, ComponentLink4URL=https://www.diodes.com/assets/Datasheets/ds30041.pdf?src-supplier=Digi-Key, ComponentLink5Description=http://www.diodes.com/datasheets/ds30041.pdf?src-supplier=Avnet+Europe, ComponentLink5URL=http://www.diodes.com/datasheets/ds30041.pdf?src-supplier=Avnet+Europe, ComponentLink6Description=http://www.diodes.com/datasheets/ds30041.pdf?src-supplier=Element14, ComponentLink6URL=http://www.diodes.com/datasheets/ds30041.pdf?src-supplier=Element14, Contact Plating=Matte,Tin, Current Rating=600mA, Element Configuration=Single, Gain Bandwidth Product=300MHz, Height=1mm, hFE Min=100, Lead Free="Lead Free", Length=3.05mm, Manufacturer Part Number=MMBT2222A-7-F, Max Breakdown Voltage=40V, Max Collector Current=600mA, Max Frequency=300MHz, Mount="Surface Mount", Number of Elements=1, Number of Pins=3, Packaging="Tape and Reel", Polarity=NPN, Pricing 1="1=0.15, 10=0.134, 100=0.0729, 500=0.04486, 1000=0.03059 (USD)", Radiation Hardening=No, REACH SVHC="No SVHC", Stock 1=2471182, Supplier 1=Digi-Key, Termination=SMD/SMT, Transition Frequency=300MHz, Voltage=40V, Voltage Rating (DC)=40V, Weight=0.000282oz, Width=1.4mm
Q3: "MOSFET P-CHAN 24V SOT23"
R1: library part RC0603FR-07680RL, "RES SMD 680 OHM 1% 1/10W 0603", Case/Package=0603, Case Code (Metric)=1608, MANUFACTURER=Yageo, Max Operating Temperature=155°C, Max Power Dissipation=100mW, Min Operating Temperature=-55°C, Package Quantity=1, Supplier Part Number 1=311-680HRCT-ND, Temperature Coefficient=100ppm/°C, Tolerance=1%, Voltage Rating=50V, Case Code (Imperial)=0603, ComponentLink1Description=http://www.farnell.com/datasheets/1868787.pdf?src-supplier=Element14, ComponentLink1URL=http://www.farnell.com/datasheets/1868787.pdf?src-supplier=Element14, ComponentLink2Description=http://documents.rs-components.com/techlib://itc_doclist_GB.htm?stockno=5048221&src-supplier=RSComponents, ComponentLink2URL=http://documents.rs-components.com/techlib://itc_doclist_GB.htm?stockno=5048221&src-supplier=RSComponents, ComponentLink3Description=http://www.farnell.com/datasheets/443971.pdf?src-supplier=Element14, ComponentLink3URL=http://www.farnell.com/datasheets/443971.pdf?src-supplier=Element14, ComponentLink4Description=http://www.yageo.com/documents/recent/PYu-RC_Group_51_RoHS_L_10.pdf?src-supplier=Digi-Key, ComponentLink4URL=http://www.yageo.com/documents/recent/PYu-RC_Group_51_RoHS_L_10.pdf?src-supplier=Digi-Key, Composition="Thick Film", Depth=0.8mm, Features="Moisture Resistant", Height=0.022inch, Lead Free="Lead Free", Length=1.6mm, Manufacturer Part Number=RC0603FR-07680RL, Military Standard=Not, Number of Pins=2, Number of Terminations=2, Packaging="Tape and Reel", Power Rating=100mW, Pricing 1="1=0.1, 10=0.024, 100=0.0097, 1000=0.00437, 2500=0.00379 (USD)", REACH SVHC="No SVHC", Resistance=680R, Stock 1=4278227, Supplier 1=Digi-Key, Termination=SMD/SMT, Voltage Rating (DC)=50V, Width=0.031inch
R1L R2L: library part RC0603FR-07330RL, "RES SMD 330 OHM 1% 1/10W 0603", Case/Package=0603, Case Code (Metric)=1608, MANUFACTURER=Yageo, Max Operating Temperature=155°C, Max Power Dissipation=100mW, Min Operating Temperature=-55°C, Package Quantity=1, Supplier Part Number 1=311-330HRCT-ND, Temperature Coefficient=100ppm/°C, Tolerance=1%, Voltage Rating=50V, Case Code (Imperial)=0603, ComponentLink1Description=http://www.yageo.com/documents/recent/PYu-RC_Group_51_RoHS_L_10.pdf?src-supplier=Digi-Key, ComponentLink1URL=http://www.yageo.com/documents/recent/PYu-RC_Group_51_RoHS_L_10.pdf?src-supplier=Digi-Key, ComponentLink2Description=http://www.farnell.com/datasheets/2167052.pdf?src-supplier=Mouser, ComponentLink2URL=http://www.farnell.com/datasheets/2167052.pdf?src-supplier=Mouser, ComponentLink3Description=http://www.farnell.com/datasheets/1868787.pdf?src-supplier=Element14, ComponentLink3URL=http://www.farnell.com/datasheets/1868787.pdf?src-supplier=Element14, ComponentLink4Description=http://www.farnell.com/datasheets/443971.pdf?src-supplier=Element14, ComponentLink4URL=http://www.farnell.com/datasheets/443971.pdf?src-supplier=Element14, ComponentLink5Description=http://www.farnell.com/datasheets/1686128.pdf?src-supplier=Element14, ComponentLink5URL=http://www.farnell.com/datasheets/1686128.pdf?src-supplier=Element14, ComponentLink6Description=http://documents.rs-components.com/techlib://itc_doclist_GB.htm?stockno=5046499&src-supplier=RSComponents, ComponentLink6URL=http://documents.rs-components.com/techlib://itc_doclist_GB.htm?stockno=5046499&src-supplier=RSComponents, Composition="Thick Film", Depth=0.8mm, Features="Moisture Resistant", Height=0.45mm, Lead Free="Lead Free", Length=1.6mm, Manufacturer Part Number=RC0603FR-07330RL, Number of Pins=2, Number of Terminations=2, Packaging="Tape and Reel", Power Rating=100mW, Pricing 1="1=0.1, 10=0.024, 100=0.0097, 1000=0.00437, 2500=0.00379 (USD)", REACH SVHC="No SVHC", Resistance=330R, Stock 1=9084897, Supplier 1=Digi-Key, Termination=SMD/SMT, Voltage Rating (DC)=50V, Width=0.8mm
R2 R4 R5: library part RC0603FR-0710KL, "RES SMD 10K OHM 1% 1/10W 0603", Case/Package=0603, Case Code (Metric)=1608, MANUFACTURER=Yageo, Max Operating Temperature=155°C, Min Operating Temperature=-55°C, Power Rating=100mW, Resistance=10kR, Supplier Part Number 1=311-10.0KHRDKR-ND, Temperature Coefficient=100ppm/°C, Tolerance=1%, Voltage Rating=75V, Voltage Rating (DC)=50V, Case Code (Imperial)=0603, ComponentLink1Description=http://www.farnell.com/datasheets/38590.pdf?src-supplier=Element14, ComponentLink1URL=http://www.farnell.com/datasheets/38590.pdf?src-supplier=Element14, ComponentLink2Description=https://www.verical.com/server-webapp/html/getDatasheet?partID=409289&src-supplier=Verical, ComponentLink2URL=https://www.verical.com/server-webapp/html/getDatasheet?partID=409289&src-supplier=Verical, ComponentLink3Description=http://www.farnell.com/datasheets/1868787.pdf?src-supplier=Element14, ComponentLink3URL=http://www.farnell.com/datasheets/1868787.pdf?src-supplier=Element14, ComponentLink4Description=http://www.farnell.com/datasheets/2167052.pdf?src-supplier=Element14, ComponentLink4URL=http://www.farnell.com/datasheets/2167052.pdf?src-supplier=Element14, ComponentLink5Description=http://www.farnell.com/datasheets/443971.pdf?src-supplier=Element14, ComponentLink5URL=http://www.farnell.com/datasheets/443971.pdf?src-supplier=Element14, Composition="Thick Film", Depth=0.8mm, Height=0.45mm, Lead Free="Lead Free", Lead Pitch=0.3mm, Length=1.6mm, Manufacturer Part Number=RC0603FR-0710KL, Military Standard=Not, Number of Pins=2, Packaging="Tape and Reel", Pricing 1="1=0.1, 10=0.024, 100=0.0097, 1000=0.00437, 2500=0.00379 (USD)", REACH SVHC="No SVHC", Stock 1=144725424, Supplier 1=Digi-Key, Termination=SMD/SMT, Weight=7.1E-05oz, Width=0.8mm
R3 R9 R10 R11 R12 R14 R15 R16 R17: library part RC0603FR-073K3L, "RES SMD 3.3K OHM 1% 1/10W 0603", Case/Package=0603, MANUFACTURER="Yageo Phycomp", Max Operating Temperature=155°C, Min Operating Temperature=-55°C, Power Rating=100mW, Resistance=3.3kR, Supplier Part Number 1=311-3.30KHRCT-ND, Temperature Coefficient=100ppm/°C, Tolerance=1%, Voltage Rating (DC)=50V, Depth=0.8mm, Height=0.45mm, Lead Free="Lead Free", Length=1.6mm, Manufacturer Part Number=RC0603FR-073K3L, Mount="Surface Mount", Number of Pins=2, Packaging="Cut Tape", Pricing 1="1=0.1, 10=0.024, 100=0.0097, 1000=0.00437, 2500=0.00379 (USD)", REACH SVHC="No SVHC", Stock 1=6863000, Supplier 1=Digi-Key, Width=800um
R6 R7 R8 R13 R18 R22 R27 R31 R32: library part CRW1218F390RE04Z, "RES SMD 390 OHM ±1% 1W ±100ppm/? 1218 Chip Resistor", Case/Package=1218, MANUFACTURER="Ever Ohms Tech", Supplier Part No.=C175553, ComponentLink1Description=http://www.yageo.com.tw/exep/pages/download/literatures/PYu-R_INT-thick_7.pdf?src-supplier=Digi-Key, ComponentLink1URL=http://www.yageo.com.tw/exep/pages/download/literatures/PYu-R_INT-thick_7.pdf?src-supplier=Digi-Key, ComponentLink2Description=http://www.yageo.com/documents/recent/PYu-RC_Group_51_RoHS_L_10.pdf?src-supplier=Digi-Key, ComponentLink2URL=http://www.yageo.com/documents/recent/PYu-RC_Group_51_RoHS_L_10.pdf?src-supplier=Digi-Key, ComponentLink3Description=http://www.yageo.com/documents/recent/PYu-RC_Group_51_RoHS_L_9.pdf?src-supplier=Digi-Key, ComponentLink3URL=http://www.yageo.com/documents/recent/PYu-RC_Group_51_RoHS_L_9.pdf?src-supplier=Digi-Key, ComponentLink4Description=http://www.farnell.com/datasheets/443971.pdf?src-supplier=Element14, ComponentLink4URL=http://www.farnell.com/datasheets/443971.pdf?src-supplier=Element14, Link=https://lcsc.com/product-detail/Chip-Resistor-Surface-Mount_Ever-Ohms-Tech-CR1218F390RE04_C175553.html, Manufacturer Part No.=CRW1218F390RE04Z, Resistance=390R, Supplier=LCSC, Termination=SMD/SMT
R19: library part RT0805BRB0710KL, "RES SMD 10K OHM 0.1% 1/8W 0805", Case/Package=0805, Case Code (Metric)=2012, MANUFACTURER=Yageo, Max Operating Temperature=125°C, Max Power Dissipation=125mW, Min Operating Temperature=-55°C, Package Quantity=1, Resistance=10kR, Supplier Part Number 1=311-10KNFCT-ND, Temperature Coefficient=10ppm/°C, Tolerance=0.1%, Voltage Rating=150V, Case Code (Imperial)=0805, ComponentLink1Description=http://www.yageo.com/documents/recent/PYu-RT_1-to-0.05_RoHS_L_6.pdf?src-supplier=Avnet, ComponentLink1URL=http://www.yageo.com/documents/recent/PYu-RT_1-to-0.05_RoHS_L_6.pdf?src-supplier=Avnet, Composition="Thin Film", Contact Plating=Tin,Matte, Depth=1.25mm, Features="Moisture Resistant", Height=0.024inch, Length=2mm, Manufacturer Part Number=RT0805BRB0710KL, Military Standard=Not, Number of Terminations=2, Packaging="Tape and Reel", Power Rating=125mW, Pricing 1="1=0.73, 10=0.606, 100=0.4071, 1000=0.23925 (USD)", Radiation Hardening=No, Stock 1=13114, Supplier 1=Digi-Key, Termination=SMD/SMT, Weight=0.000194oz, Width=1.25mm
R20 R21 R23 R24 R25 R26 R28 R29 R30: library part RT0603DRD07200RL, "RES SMD 200 OHM 0.5% 1/10W 0603", Case/Package=0603, MANUFACTURER=Yageo, Power Rating=100mW, Supplier Part Number 1=311-200DCT-ND, Tolerance=0.5%, Voltage Rating (DC)=50V, Lead Free="Lead Free", Manufacturer Part Number=RT0603DRD07200RL, Packaging="Cut Tape", Pricing 1="1=0.21, 10=0.174, 100=0.0682, 1000=0.02855, 2500=0.02617 (USD)", Resistance=200R, Stock 1=19572, Supplier 1=Digi-Key
R33: library part RC0603FR-07133KL, "RES SMD 133K OHM 1% 1/10W 0603", Case/Package=0603, Case Code (Metric)=1608, MANUFACTURER=Yageo, Max Operating Temperature=155°C, Max Power Dissipation=100mW, Min Operating Temperature=-55°C, Package Quantity=1, Resistance=133kR, Supplier Part Number 1=311-133KHRCT-ND, Temperature Coefficient=100ppm/°C, Tolerance=1%, Voltage Rating=50V, Case Code (Imperial)=0603, ComponentLink1Description=http://www.yageo.com/documents/recent/PYu-RC_Group_51_RoHS_L_10.pdf?src-supplier=Digi-Key, ComponentLink1URL=http://www.yageo.com/documents/recent/PYu-RC_Group_51_RoHS_L_10.pdf?src-supplier=Digi-Key, ComponentLink2Description=http://www.yageo.com/documents/recent/PYu-RC_Group_51_RoHS_L_9.pdf?src-supplier=Digi-Key, ComponentLink2URL=http://www.yageo.com/documents/recent/PYu-RC_Group_51_RoHS_L_9.pdf?src-supplier=Digi-Key, ComponentLink3Description=http://www.mouser.com/catalog/specsheets/RC0603.pdf?src-supplier=Mouser, ComponentLink3URL=http://www.mouser.com/catalog/specsheets/RC0603.pdf?src-supplier=Mouser, Composition="Thick Film", Depth=0.8mm, Features="Moisture Resistant", Height=0.022inch, Lead Free="Lead Free", Length=1.6mm, Manufacturer Part Number=RC0603FR-07133KL, Military Standard=Not, Number of Terminations=2, Packaging="Tape and Reel", Power Rating=100mW, Pricing 1="1=0.1, 10=0.024, 100=0.0097, 1000=0.00437, 2500=0.00379 (USD)", Stock 1=1119965, Supplier 1=Digi-Key, Termination=SMD/SMT, Voltage Rating (DC)=50V, Width=0.031inch
R34: library part RT0603DRE0749K3L, "Thin Film Resistors - SMD 1/10W 49.3K Ohms .5%", Case/Package=0603, MANUFACTURER=Yageo, Resistance=49.3kR, Supplier Part Number 1=603-RT0603DRE0749K3L, Tolerance=0.5%, Manufacturer Part Number=RT0603DRE0749K3L, Pricing 1="1=0.16, 10=0.09, 50=0.09, 100=0.03, 1000=0.03, 10000=0.02 (USD)", Stock 1=12765, Supplier 1=Mouser
R35 R36 R37 R38 R39 R40 R41: library part 3522120RJT, "RES SMD 120 OHM 5% 3W 2512", Case/Package=2512, Case Code (Metric)=6432, MANUFACTURER="TE Connectivity CGS", Max Operating Temperature=105°C, Min Operating Temperature=-55°C, Number of Resistors=1, Power Rating=3W, Supplier Part Number 1=A121132CT-ND, Temperature Coefficient=100ppm/°C, Tolerance=5%, Voltage Rating=250V, Case Code (Imperial)=2512, Composition="Power resistor,Thick Film", Depth=3.2mm, Height=1.1mm, Length=6.35mm, Manufacturer Part Number=3522120RJT, Mount="Surface Mount", Number of Terminations=2, Packaging="Tape and Reel", Pricing 1="1=0.65, 10=0.541, 100=0.3634, 1000=0.21265 (USD)", REACH SVHC=Unknown, Resistance=120R, Stock 1=33369, Supplier 1=Digi-Key, Termination=Solder, Voltage Rating (DC)=250V
R44: library part RT0603BRD07100KL, "RES SMD 100K OHM 0.1% 1/10W 0603", Case/Package=0603, Case Code (Metric)=1608, MANUFACTURER=Yageo, Max Operating Temperature=125°C, Max Power Dissipation=100mW, Min Operating Temperature=-55°C, Package Quantity=5000, Resistance=100kR, Supplier Part Number 1=YAG1235CT-ND, Temperature Coefficient=25ppm/°C, Tolerance=0.1%, Voltage Rating=75V, Case Code (Imperial)=0603, ComponentLink1Description=http://documents.rs-components.com/techlib://itc_doclist_GB.htm?stockno=6174810&src-supplier=RSComponents, ComponentLink1URL=http://documents.rs-components.com/techlib://itc_doclist_GB.htm?stockno=6174810&src-supplier=RSComponents, Composition="Thin Film", Depth=0.8mm, Features="Moisture Resistant", Height=0.022inch, Lead Free="Lead Free", Length=1.6mm, Manufacturer Part Number=RT0603BRD07100KL, Military Standard=Not, Mount="Surface Mount", Number of Terminations=2, Packaging="Tape and Reel", Power Rating=100mW, Pricing 1="1=0.39, 10=0.332, 100=0.1298, 1000=0.05435, 2500=0.04982 (USD)", Stock 1=53395, Supplier 1=Digi-Key, Termination=SMD/SMT, Voltage Rating (DC)=75V, Width=0.031inch, Working Voltage=75V
U1: "Conv DC-DC 1.8V to 5.5V Non-Inv/Inv/Step Up/Step Down Single-Out 3.3V 0.8A 10-Pin WSON", MANUFACTURER="Texas Instruments", Max Input Voltage=5.5V, Max Operating Temperature=85°C, Max Output Current=800mA, Min Input Voltage=1.8V, Min Operating Temperature=-40°C, Min Output Voltage=3.3V, Package Quantity=3000, Quiescent Current=25uA, Supplier Part Number 1=TPS63031DSKR**MULT1, Switching Frequency=2.4MHz, ComponentLink1Description=http://www.ti.com/lit/ds/symlink/tps63001.pdf, ComponentLink1URL=http://www.ti.com/lit/ds/symlink/tps63001.pdf, ComponentLink2Description=http://focus.ti.com/lit/ds/symlink/tps63001.pdf, ComponentLink2URL=http://focus.ti.com/lit/ds/symlink/tps63001.pdf, ComponentLink3Description=http://www.ti.com/general/docs/lit/getliterature.tsp?genericPartNumber=TPS63002&&fileType=pdf, ComponentLink3URL=http://www.ti.com/general/docs/lit/getliterature.tsp?genericPartNumber=TPS63002&&fileType=pdf, ComponentLink4Description=http://www.ti.com/general/docs/lit/getliterature.tsp?genericPartNumber=TPS63031&&fileType=pdf&src-supplier=Avnet, ComponentLink4URL=http://www.ti.com/general/docs/lit/getliterature.tsp?genericPartNumber=TPS63031&&fileType=pdf&src-supplier=Avnet, ComponentLink5Description=http://www.ti.com/lit/ds/symlink/tps63030.pdf?src-supplier=Digi-Key, ComponentLink5URL=http://www.ti.com/lit/ds/symlink/tps63030.pdf?src-supplier=Digi-Key, Contact Plating=Gold, Efficiency=96%, Lead Free="Lead Free", Manufacturer Part Number=TPS63031DSKR, Mount="Surface Mount", Nominal Output Voltage=3.3V, Number of Outputs=1, Number of Pins=10, Operating Supply Voltage=5.5V, Output Configuration=Positive, Output Current=800mA, Output Type=Fixed, Output Voltage=3.3V, Packaging="Tape and Reel", Radiation Hardening=No, REACH SVHC="No SVHC", Stock 1=0, Supplier 1=Arrow, Synchronous Rectifier=Yes, Topology=Buck-Boost
U2: "IC BAT CHG LI-ION 1 CELL SOT23-6", MANUFACTURER="Texas Instruments", Supplier Part Number 1=296-47315-1-ND, Lead Free="Lead Free", Manufacturer Part Number=BQ21040DBVR, Number of Cells=1, Pricing 1="1=1.14, 10=1.015, 100=0.7912, 500=0.65364, 1000=0.51603 (USD)", Stock 1=10857, Supplier 1=Digi-Key
U3: "SMD MODULE, ESP32-D0WDQ6, 32MBIT", MANUFACTURER="Espressif Systems", Supplier Part Number 1=1904-1010-1-ND, Manufacturer Part Number=ESP32-WROOM-32, Pricing 1="1=3.8 (USD)", Stock 1=968, Supplier 1=Digi-Key
U4 U5 U6 U7 U8 U9 U10 U11 U12: "TransistorOptocouplers DC 1 2500Vrms SOP-4_P1.27 Optocouplers RoHS", Case/Package=SOIC, Collector Emitter Saturation Voltage=300mV, Forward Voltage=1.2V, MANUFACTURER=CEL, Max Collector Current=30mA, Max Operating Temperature=100°C, Max Output Voltage=80V, Max Power Dissipation=120mW, Min Operating Temperature=-55°C, Package Quantity=1, Supplier Part Number 1=PS2801C-1-F3-ACT-ND, Collector Emitter Voltage (VCEO)=300mV, ComponentLink1Description=http://www.cel.com/pdf/datasheets/PS2801C-1,PS2801C-4.pdf?src-supplier=Digi-Key, ComponentLink1URL=http://www.cel.com/pdf/datasheets/PS2801C-1,PS2801C-4.pdf?src-supplier=Digi-Key, ComponentLink2Description=http://www.cel.com/pdf/datasheets/how_to_order_optos.pdf?src-supplier=Digi-Key, ComponentLink2URL=http://www.cel.com/pdf/datasheets/how_to_order_optos.pdf?src-supplier=Digi-Key, ComponentLink3Description=http://datasheet.iiic.cc/cel/PS2801C-1-F3-A.pdf?src-supplier=IIIC, ComponentLink3URL=http://datasheet.iiic.cc/cel/PS2801C-1-F3-A.pdf?src-supplier=IIIC, Lead Free="Lead Free", Manufacturer Part Number=PS2801C-1-F3-A, Mount="Surface Mount", Number of Channels=1, Number of Pins=4, Output Current per Channel=30mA, Packaging="Tape and Reel", Pricing 1="1=0.77, 10=0.595, 100=0.3825 (USD)", Stock 1=399, Supplier 1=Digi-Key
USB1: "USB - Micro B Female USB 2 5 SMD USB Connectors RoHS", MANUFACTURER="Jing Extension of the Electronic Co.", ComponentLink1Description=http://www.amphenol-icc.com/media/wysiwyg/files/drawing/10118194.pdf?src-supplier=Digi-Key, ComponentLink1URL=http://www.amphenol-icc.com/media/wysiwyg/files/drawing/10118194.pdf?src-supplier=Digi-Key, ComponentLink2Description=https://cdn.amphenol-icc.com/media/wysiwyg/files/drawing/10118194.pdf?src-supplier=Mouser, ComponentLink2URL=https://cdn.amphenol-icc.com/media/wysiwyg/files/drawing/10118194.pdf?src-supplier=Mouser, ComponentLink3Description=https://cdn.amphenol-icc.com/media/wysiwyg/files/drawing/10118194.pdf?src-supplier=Verical, ComponentLink3URL=https://cdn.amphenol-icc.com/media/wysiwyg/files/drawing/10118194.pdf?src-supplier=Verical, Connector Type=USB,Receptacle, Gender=Receptacle, Link=https://lcsc.com/product-detail/USB-Connectors_Jing-Extension-of-the-Electronic-Co-C10418_C10418.html, Manufacturer Part Number=C10418, Mount="Surface Mount,Horizontal", Number of Contacts=5, Number of Ports=1, Number of Terminals=5, Orientation="Right Angle", Termination=Solder
T1 T2 T3 T4 T5 T6 T7 T8 T9 T10 T11 T12 T13 T14 T15 T16 T17: LatestRevisionDate=17-Jul-2002, LatestRevisionNote="Re-released for DXP Platform.", Publisher="Altium Limited"

## Free pads (board coordinates)
  oct 200x200 hole 100: MH(1103,3078) MH(1103,5014) MH(3167,3078) MH(3167,5014)

## Via types
v1: diameter 27.56, hole 11.81, Top Layer to Bottom Layer, tented both sides, 57 vias
v2: diameter 27.56, hole 11.81, Top Layer to Bottom Layer, 30 vias

## Nets (pads, with @x,y where several pads share a name; then routed paths per layer and width w, separated by ;. In a path a pad name is that pad's centre, name@x,y a point inside that pad or via, vN(x,y) a via of type N, cw(c..) or ccw(c..) an arc to the next point about the centre after c; other vN are vias at no path point)
2_GND: D8.1 J3.11 R30.1 | length 2046.9
  Top Layer w25: v1(2123,4750.08) 2123,5002 2221,5100 v1(2855.34,5100)
  Bottom Layer w25: v1(2123,4750.08) 2157.31,4750.08 R30.1 ; D8.1@2152,4804 D8.1 ; v1(2855.34,5100) 2855.34,4951.12 3216,4590.46 3216,4410.96 J3.11 ; J3.11@3124,4327.96 J3.11@3128.5,4332.46
3_GND: D9.1 J3.13 R23.1 | length 1309.8
  Bottom Layer w25: D9.1@2160.5,5011.71 D9.1 2166.71,5039.71 2200,5073 2619.4,5073 3133,4559.4 J3.13
3V3: C7.1 C8.1 C11.1 C12.1 J1.1 R1L.2 R2L.2 R3.2 R9.2 R10.2 R11.2 R12.2 R14.2 R15.2 R16.2 R17.2 R19.2 T1.1 U1.1 U1.10 U3.2 | length 4305.8
  Top Layer w12: 1495,3290.47 1551,3234.47 1551,3167 J1.1@1562,3156
  Top Layer w25: v2(1265,4366) 1265,4431 1319,4485 v2(1319,4522) 1263,4578 1263,4745.97 v1(1290.03,4773) U3.2 ; v2(1279.73,3505.73) 1495,3290.47 ; v1(1390,3782.02) 1390,3946 1445,4001 1445,4163 1475,4193 v1(1522,4193) ; R2L.2 1558.52,3731.02 1482.72,3806.82 1482.72,3911.72 1582,4011 1680,4011 1696,3995 C8.1 1722.73,3966 1749,3992.27 v1(1749,4024)
  Bottom Layer w10: U1.10 1585.6,3985
  Bottom Layer w25: v1(1037,3505.73) v2(1279.73,3505.73) 1279.73,3671.76 v1(1390,3782.02) ; v2(1265,4366) 1265,4255.71 1327.71,4193 v1(1522,4193) ; R19.2 1269.83,4522 v2(1319,4522) ; R10.2 v1(1522,4193) ; R9.2@1522,4306 R15.2@1883,4306 ; 1585.6,3985 1585.6,4047.4 1522,4111 v1(1522,4193) ; C7.1 v1(1749,4024) 1749,4131 1825.5,4207.5 R17.2@1883,4207.5
AN_1: D1.2 R6.1 T9.1 U4.1 | length 172.8
  Top Layer w20: T9.1 2246.21,3405 2273,3378.21 v1(2273,3339.5) U4.1
AN_2: D2.2 R7.1 T10.1 U5.1 | length 166.3
  Top Layer w20: T10.1 2245.71,3606 2273,3578.71 v1(2273,3541.68) ; U5.1 v1@2268,3541.68
AN_4: D3.2 R13.1 T11.1 U6.1 | length 171.7
  Top Layer w20: T11.1 2245,3807 2273,3779 v1(2273,3741.87) U6.1
AN_5: D4.2 R18.1 T12.1 U7.1 | length 173.1
  Top Layer w20: T12.1 2246,4009 2273,3982 v1(2273,3943.06) U7.1
AN_6: D5.2 R22.1 T13.1 U8.1 | length 181.9
  Top Layer w20: T13.1@2197,4212 T13.1 2245.93,4212 2273,4184.93 v1(2273,4145.25) U8.1
AN_7: D6.2 R27.1 T14.1 U9.1 | length 169.4
  Top Layer w20: T14.1 2241.94,4405 2273,4373.94 v1(2273,4340.44) U9.1
AN_8: D7.2 R31.1 T15.1 U10.1 | length 169.8
  Top Layer w20: T15.1 2243,4605 2273,4575 2273,4540.62 U10.1
  other v1: 2274,4540.62
AN_9: D8.2 R32.1 T16.1 U11.1 | length 170.6
  Top Layer w20: T16.1 2243,4807 2273,4777 v1(2273,4741.81) U11.1
AN_10: D9.2 R8.1 T17.1 U12.1 | length 178.2
  Top Layer w20: T17.1@2197,5010 T17.1 2241,5010 2273,4978 v1(2273,4944) U12.1
"BATTERY POWER": J3.9 R32.2 | length 1034.2
  Bottom Layer w25: R32.2 2619.05,4693.45 2716,4596.5 2716,4360 2905.52,4170.48 J3.9
Break_: J3.12 R33.2 | length 2512.8
  Top Layer w20: v1(1706.95,4420.95) 1765.91,4420.95 1917,4572.04 v1(1917,4596)
  Bottom Layer w20: R33.2 v1(1706.95,4420.95) ; v1(1917,4596) 1918,4597 1918,4679.67 2103,4864.67 2103,5030 2179,5106 2645,5106 3180,4571 3180,4453.7 J3.12 ; J3.12@3124,4406.7 J3.12@3128.5,4411.2
Cath_1: R20.2 U4.2 | length 55
  Top Layer w20: U4.2 v1(2273,3289.5)
Cath_2: R21.2 U5.2 | length 50
  Top Layer w20: U5.2 v1@2268,3491.68
  other v1: 2273,3491.68
Cath_4: R24.2 U6.2 | length 55
  Top Layer w20: U6.2 v1(2273,3691.87)
Cath_5: R25.2 U7.2 | length 55
  Top Layer w20: U7.2 v1(2273,3893.06)
Cath_6: R26.2 U8.2 | length 50
  Top Layer w20: U8.2 v1@2268,4095.25
  other v1: 2273,4095.25
Cath_7: R28.2 U9.2 | length 50
  Top Layer w20: U9.2 v1@2268,4290.44
  other v1: 2273,4290.44
Cath_8: R29.2 U10.2 | length 55
  Top Layer w20: U10.2 v1(2273,4490.62)